# Altium PCB DC-UPS-v1.0.PcbDoc (part 3 of 8)
Units mil, origin at the board's own origin, x right, y up, seen from the top; angles counter-clockwise.
Board outline 5905.51 x 3937.01 mil, 4 copper layers (Top Layer, SIG+PWR, SIG+GND, Bottom Layer), stack 62.449 mil thick; 278 components, 138 nets, 716 pads, 780 vias.
Unrouted connection lines stored in the file: 13.
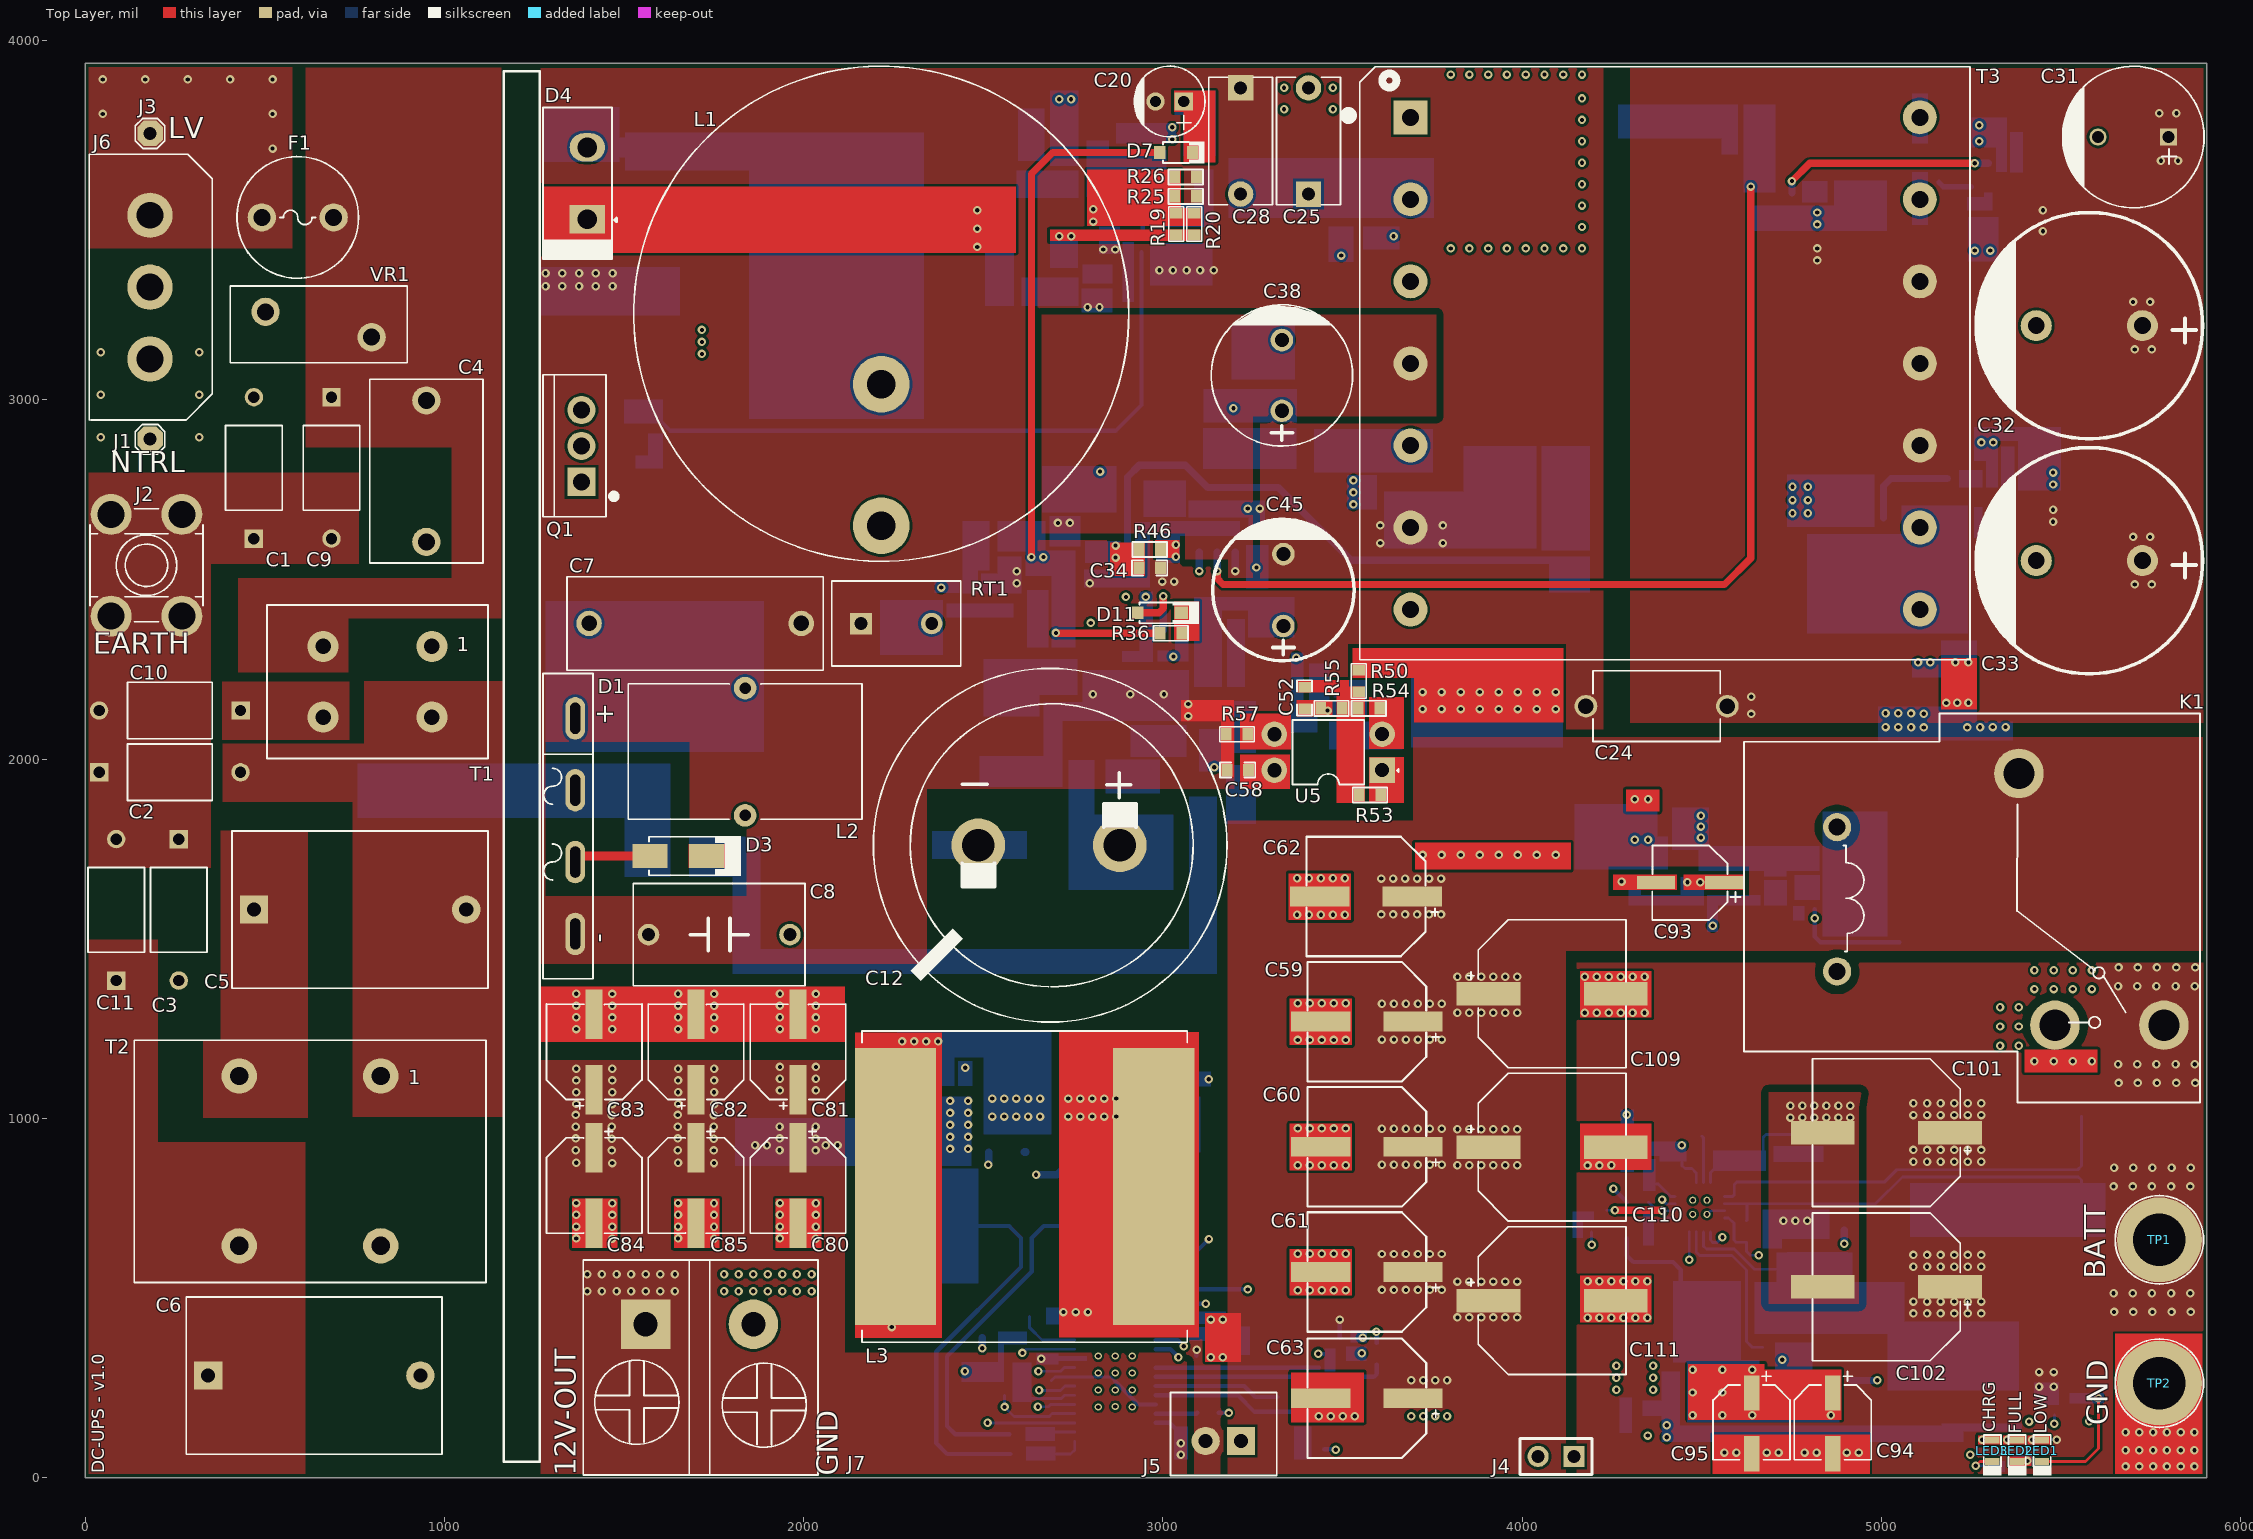
[diagram p0: Top Layer view]

## Part data (continued)
C80 C81 C82 C83 C84 C85: library part 16SVPG270M, "CAP ALUM POLY 270UF 20% 16V SMD", Case/Package=Radial, Dielectric Material=Aluminium, ESR (Equivalent Series Resistance)=8mR, LCSC Part Number=C178351, Leakage Current=864uA, Manufacturer=Panasonic, Max Operating Temperature=105°C, Min Operating Temperature=-55°C, Package Quantity=500, Tolerance=20%, Voltage=24V, Voltage Rating=16V, ComponentLink1Description=http://www.farnell.com/datasheets/2579260.pdf?src-supplier=Farnell, ComponentLink1URL=http://www.farnell.com/datasheets/2579260.pdf?src-supplier=Farnell, ComponentLink2Description=http://industrial.panasonic.com/www-data/pdf/AAB8000/AAB8000CE14.pdf?src-supplier=Avnet, ComponentLink2URL=http://industrial.panasonic.com/www-data/pdf/AAB8000/AAB8000CE14.pdf?src-supplier=Avnet, ComponentLink3Description=http://industrial.panasonic.com/cdbs/www-data/pdf/AAB8000/AAB8000C175.pdf?src-supplier=Farnell, ComponentLink3URL=http://industrial.panasonic.com/cdbs/www-data/pdf/AAB8000/AAB8000C175.pdf?src-supplier=Farnell, ComponentLink4Description=http://www.farnell.com/datasheets/1950075.pdf?src-supplier=Element14, ComponentLink4URL=http://www.farnell.com/datasheets/1950075.pdf?src-supplier=Element14, ComponentLink5Description=https://datasheet.octopart.com/16SVPG270M-Panasonic-datasheet-138704366.pdf?src-supplier=TME, ComponentLink5URL=https://datasheet.octopart.com/16SVPG270M-Panasonic-datasheet-138704366.pdf?src-supplier=TME, ComponentLink6Description=https://datasheet.octopart.com/16SVPG270M-Panasonic-datasheet-151609408.pdf?src-supplier=Master+Electronics, ComponentLink6URL=https://datasheet.octopart.com/16SVPG270M-Panasonic-datasheet-151609408.pdf?src-supplier=Master+Electronics, Diameter=6.3mm, Dissipation Factor=12%, Height=6.6mm, Item Type=Capacitors, Lead Free="Lead Free", Lead Pitch=2.1mm, Length=9.9mm, Life (Hours)=5000Hour, Manufacturer Part Number=16SVPG270M, Material=4242ConductorMaterial, Mounting Technology="Surface Mount", Packaging="Tape and Reel", Pins=10, Pricing="500=0.5687, 1000=0.54, 2500=0.5149, 5000=0.5016, 10000=0.4827 (USD)", Reach SVHC Compliant=No, RoHS=Yes, RoHS Compliant=Yes, Series=SVPG, Stock=18500, Supplier="Arrow Electronics", Termination=SMD/SMT, Voltage Rating (DC)=16V, Width=6.6mm
C87: library part CC0603JRNPO9BN331, "CAP CER 330PF 50V C0G/NPO 0603", Capacitor Type=Ceramic, Case/Package=0603, LCSC Part Number=C62784, Manufacturer=Yageo, Max Operating Temperature=125°C, Min Operating Temperature=-55°C, Package Shape=Rectangular, Package Style=SMTMeter, Rated DC Voltage (URdc)=50V, Supplier Part Number 1=8843708, Temperature Characteristics Code=C0G, Tolerance  (fill in as +-)=5%, Category="Ceramic Capacitors", ComponentLink1Description=https://datasheet.ciiva.com:443/pdfs/VipMasterIC/IC/YAGO/YAGO-S-A0009251638/YAGO-S-A0009251638-1.pdf?src-supplier=IHS+Markit, ComponentLink1URL=https://datasheet.ciiva.com:443/pdfs/VipMasterIC/IC/YAGO/YAGO-S-A0009251638/YAGO-S-A0009251638-1.pdf?src-supplier=IHS+Markit, ComponentLink2Description=https://datasheet.ciiva.com/28450/1443161-28450501.pdf?src-supplier=Element14, ComponentLink2URL=https://datasheet.ciiva.com/28450/1443161-28450501.pdf?src-supplier=Element14, ComponentLink3Description=https://datasheet.ciiva.com/144/mlccorderingcode-144957.pdf?src-supplier=Digi-Key, ComponentLink3URL=https://datasheet.ciiva.com/144/mlccorderingcode-144957.pdf?src-supplier=Digi-Key, ComponentLink4Description=https://datasheet.ciiva.com/144/mlccorderingcode-144956.pdf?src-supplier=Digi-Key, ComponentLink4URL=https://datasheet.ciiva.com/144/mlccorderingcode-144956.pdf?src-supplier=Digi-Key, ComponentLink5Description=https://datasheet.ciiva.com/144/mlccorderingcode-144958.pdf?src-supplier=Digi-Key, ComponentLink5URL=https://datasheet.ciiva.com/144/mlccorderingcode-144958.pdf?src-supplier=Digi-Key, ComponentLink6Description=https://datasheet.ciiva.com/8033/1443161-8033739.pdf?src-supplier=Element14, ComponentLink6URL=https://datasheet.ciiva.com/8033/1443161-8033739.pdf?src-supplier=Element14, ComponentLink7Description=https://datasheet.ciiva.com/8033/1443161-8033737.pdf?src-supplier=Element14, ComponentLink7URL=https://datasheet.ciiva.com/8033/1443161-8033737.pdf?src-supplier=Element14, ComponentLink8Description=https://datasheet.ciiva.com/13389/upy-gp-np0-16v-to-50v-8-13389983.pdf?src-supplier=Mouser, ComponentLink8URL=https://datasheet.ciiva.com/13389/upy-gp-np0-16v-to-50v-8-13389983.pdf?src-supplier=Mouser, ComponentLink9Description=https://datasheet.ciiva.com/11587/upy-gp-np0-16v-to-50v-8-11587326.pdf?src-supplier=Avnet, ComponentLink9URL=https://datasheet.ciiva.com/11587/upy-gp-np0-16v-to-50v-8-11587326.pdf?src-supplier=Avnet, ComponentLink10Description=https://datasheet.ciiva.com/26829/getdatasheetpartid-403533-26829382.pdf?src-supplier=Verical, ComponentLink10URL=https://datasheet.ciiva.com/26829/getdatasheetpartid-403533-26829382.pdf?src-supplier=Verical, Dielectric Material=Ceramic, Height=0.8mm, Item Type=Capacitor, JESD-609 Code=e3, Length=1.6mm, Manufacturer Part Number=CC0603JRNPO9BN331, Mounting Technology="Surface Mount", Multilayer=Yes, Packaging="Tape and Reel", Pins=2, Pricing 1="4000=0.00990, 16000=0.00940, 20000=0.00980, 40000=0.00910, 80000=0.00930, 100000=0.00880, 160000=0.00830, 200000=0.00900, 500000=0.00850 (USD)", Reach SVHC Compliant=Yes, RoHS=Yes, RoHS Compliant=Yes, Stock 1=40000, Supplier 1="Future Electronics", Terminal Finish=Nickel, Termination=Wraparound, Tolerance (fill in as +-)=5%, Width=0.8mm
C93: library part RVT1E330M0505, "33uF 25V 30mA@120Hz ±20% SMD,D5xL5.4mm Aluminum Electrolytic Capacitors - SMD ROHS", LCSC Part Number=C72507, Manufacturer=ROQANG, Package=SMD,D5xL5.4mm, ComponentLink1Description=LCSC, ComponentLink1URL=https://www.lcsc.com/product-detail/Aluminum-Electrolytic-Capacitors-SMD_ROQANG-RVT1E330M0505_C72507.html, Item Type=Capacitor, Manufacturer Part Number=RVT1E330M0505
C94 C95: library part UUD1V150MCL1GS, "CAP ALUM 15UF 20% 35V SMD", Case/Package=Radial, Dielectric Material=Aluminium, LCSC Part Number=C445253, Leakage Current=5.25uA, Manufacturer=Nichicon, Max Operating Temperature=105°C, Min Operating Temperature=-55°C, Package Quantity=1000, Ripple Current=150mA, Tolerance=20%, Voltage Rating=35V, Category="Aluminum Electrolytic Capacitors", ComponentLink1Description=https://datasheet.ciiva.com/96/e-ud-96810.pdf?src-supplier=Digi-Key, ComponentLink1URL=https://datasheet.ciiva.com/96/e-ud-96810.pdf?src-supplier=Digi-Key, ComponentLink2Description=https://datasheet.ciiva.com/96/e-ud-96811.pdf?src-supplier=Digi-Key, ComponentLink2URL=https://datasheet.ciiva.com/96/e-ud-96811.pdf?src-supplier=Digi-Key, ComponentLink3Description=https://datasheet.ciiva.com/96/e-ud-96812.pdf?src-supplier=Digi-Key, ComponentLink3URL=https://datasheet.ciiva.com/96/e-ud-96812.pdf?src-supplier=Digi-Key, Construction=Cylindrical, Diameter=5mm, Height=5.8mm, Impedance=760mR, Item Type=Capacitor, Lead Free="Lead Free", Length=5.8mm, Life (Hours)=2000Hour, Manufacturer Part Number=UUD1V150MCL1GS, Packaging="Tape and Reel", Pins=2, Pricing 1="1=0.1001 (USD)", Radiation Hardening=No, RoHS=Yes, RoHS Compliant=Yes, Series=UD, Stock 1=1, Supplier 1="Arrow Electronics", Supplier Part Number 1=UUD1V150MCL1GS, Termination=SMD/SMT, Voltage Rating (DC)=35V
C97 C99 C100 C107: library part CL10A105KB8NNNC, "CAP CER 1UF 50V X5R 0603", Case Code (Imperial)=0603, Case Code (Metric)=1608, Dielectric=X5R, LCSC Part Number=C15849, Manufacturer=Samsung, Max Operating Temperature=85°C, Min Operating Temperature=-55°C, Tolerance=10%, Voltage Rating=50V, Case/Package=0603, Category="Ceramic Capacitors", ComponentLink1Description=https://datasheet.ciiva.com/26877/getdatasheetpartid-753736-26877879.pdf?src-supplier=Verical, ComponentLink1URL=https://datasheet.ciiva.com/26877/getdatasheetpartid-753736-26877879.pdf?src-supplier=Verical, Depth=0.8mm, Item Type=Capacitor, Length=1.6mm, Manufacturer Part Number=CL10A105KB8NNNC, Material=4241ConductorMaterial, Mounting Technology="Surface Mount", Packaging="Tape and Reel", Pricing="4000=0.01632, 8000=0.01595, 16000=0.01557, 24000=0.0152, 32000=0.01482 (USD)", Radiation Hardening=No, RoHS=Yes, RoHS Compliant=Yes, Series=CL, Stock=780446, Supplier=Avnet, Supplier Part Number=CL10A105KB8NNNC, Voltage Rating (DC)=50V
C101 C102 C109 C110 C111: library part 50SVPF68M, "CAP ALUM POLY 68UF 20% 50V SMD", LCSC Part Number=C178375, Manufacturer=Panasonic, ComponentLink1Description=https://datasheet.ciiva.com/25761/1734360-25761295.pdf?src-supplier=Farnell, ComponentLink1URL=https://datasheet.ciiva.com/25761/1734360-25761295.pdf?src-supplier=Farnell, ComponentLink2Description=https://datasheet.ciiva.com/24071/svpf-os-262415-24071528.pdf?src-supplier=Mouser, ComponentLink2URL=https://datasheet.ciiva.com/24071/svpf-os-262415-24071528.pdf?src-supplier=Mouser, ComponentLink3Description=https://datasheet.ciiva.com/22746/1734360-22746280.pdf?src-supplier=Element14, ComponentLink3URL=https://datasheet.ciiva.com/22746/1734360-22746280.pdf?src-supplier=Element14, Item Type=Capacitors, Manufacturer Part Number=50SVPF68M, Material=4242ConductorMaterial, Pricing="400=1.08, 800=1.05, 1200=1.03, 1600=1.02, 2000=0.985 (USD)", RoHS=Yes, Stock=8800, Supplier="Future Electronics"
C104: library part CC0402JRNPO9BN220, "CAP CER 22PF 50V C0G/NPO 0402", Case Code (Imperial)=0402, Case Code (Metric)=1005, Dielectric=C0G, Dielectric Material=Ceramic, Insulation Resistance=100GR, LCSC Part Number=C106203, Manufacturer=Yageo, Max Operating Temperature=125°C, Min Operating Temperature=-55°C, Package Quantity=1, Supplier Part Number 1=9105957, Temperature Coefficient=30ppm/°C, Tolerance=5%, Voltage=50V, Case/Package=0402, Category="Ceramic Capacitors", ComponentLink1Description=https://datasheet.ciiva.com/5789/1443161-5789509.pdf?src-supplier=Farnell, ComponentLink1URL=https://datasheet.ciiva.com/5789/1443161-5789509.pdf?src-supplier=Farnell, ComponentLink2Description=https://datasheet.ciiva.com/8033/1443161-8033606.pdf?src-supplier=Element14, ComponentLink2URL=https://datasheet.ciiva.com/8033/1443161-8033606.pdf?src-supplier=Element14, ComponentLink3Description=https://datasheet.ciiva.com/7656/1132289-7656615.pdf?src-supplier=Element14, ComponentLink3URL=https://datasheet.ciiva.com/7656/1132289-7656615.pdf?src-supplier=Element14, ComponentLink4Description=https://datasheet.ciiva.com/8033/1443161-8033607.pdf?src-supplier=Element14, ComponentLink4URL=https://datasheet.ciiva.com/8033/1443161-8033607.pdf?src-supplier=Element14, ComponentLink5Description=https://datasheet.ciiva.com/8033/1443161-8033605.pdf?src-supplier=Element14, ComponentLink5URL=https://datasheet.ciiva.com/8033/1443161-8033605.pdf?src-supplier=Element14, ComponentLink6Description=https://datasheet.ciiva.com/143/mlccorderingcode-143987.pdf?src-supplier=Digi-Key, ComponentLink6URL=https://datasheet.ciiva.com/143/mlccorderingcode-143987.pdf?src-supplier=Digi-Key, ComponentLink7Description=https://datasheet.ciiva.com/143/mlccorderingcode-143986.pdf?src-supplier=Digi-Key, ComponentLink7URL=https://datasheet.ciiva.com/143/mlccorderingcode-143986.pdf?src-supplier=Digi-Key, ComponentLink8Description=https://datasheet.ciiva.com/143/mlccorderingcode-143988.pdf?src-supplier=Digi-Key, ComponentLink8URL=https://datasheet.ciiva.com/143/mlccorderingcode-143988.pdf?src-supplier=Digi-Key, ComponentLink9Description=https://datasheet.ciiva.com/5425/upy-gp-np0-16v-to-50v-8-5425483.pdf?src-supplier=Mouser, ComponentLink9URL=https://datasheet.ciiva.com/5425/upy-gp-np0-16v-to-50v-8-5425483.pdf?src-supplier=Mouser, ComponentLink10Description=https://datasheet.ciiva.com/15189/getdatasheetpartid-370074-15189117.pdf?src-supplier=Verical, ComponentLink10URL=https://datasheet.ciiva.com/15189/getdatasheetpartid-370074-15189117.pdf?src-supplier=Verical, Depth=0.5mm, Height=0.5mm, Item Type=Capacitor, Lead Free="Lead Free", Length=1mm, Manufacturer Part Number=CC0402JRNPO9BN220, Mounting Technology="Surface Mount", Packaging="Tape and Reel", Pins=2, Pricing 1="10000=0.00220, 40000=0.00210, 150000=0.00200, 400000=0.00190, 1000000=0.00180 (USD)", Radiation Hardening=No, Reach SVHC Compliant=Yes, Resistor Type=Ceramic, RoHS=Yes, RoHS Compliant=Yes, Series=CC, Stock 1=200000, Supplier 1="Future Electronics", Termination=SMD/SMT, Thickness=0.022inch, Voltage Rating=50V, Voltage Rating (DC)=50V, Width=0.02inch
C108: library part CC0402JRNPO9BN101, "CAP CER 100PF 50V C0G/NPO 0402", Case Code (Imperial)=0402, Case Code (Metric)=1005, Dielectric=C0G, Dielectric Material=Ceramic, Insulation Resistance=100GR, LCSC Part Number=C106200, Manufacturer=Yageo, Max Operating Temperature=125°C, Min Operating Temperature=-55°C, Package Quantity=1, Supplier Part Number=8934564, Temperature Coefficient=30ppm/°C, Tolerance=5%, Voltage=50V, Case/Package=0402, Category="Ceramic Capacitors", ComponentLink1Description=https://datasheet.ciiva.com/11786/0900766b80d84fbf-11786101.pdf?src-supplier=Rs, ComponentLink1URL=https://datasheet.ciiva.com/11786/0900766b80d84fbf-11786101.pdf?src-supplier=Rs, ComponentLink2Description=https://datasheet.ciiva.com/23767/25787-23767888.pdf?src-supplier=Newark, ComponentLink2URL=https://datasheet.ciiva.com/23767/25787-23767888.pdf?src-supplier=Newark, ComponentLink3Description=https://datasheet.ciiva.com/28450/1443161-28450220.pdf?src-supplier=Element14, ComponentLink3URL=https://datasheet.ciiva.com/28450/1443161-28450220.pdf?src-supplier=Element14, ComponentLink4Description=https://datasheet.ciiva.com/8033/1443161-8033598.pdf?src-supplier=Element14, ComponentLink4URL=https://datasheet.ciiva.com/8033/1443161-8033598.pdf?src-supplier=Element14, ComponentLink5Description=https://datasheet.ciiva.com/143/mlccorderingcode-143990.pdf?src-supplier=Digi-Key, ComponentLink5URL=https://datasheet.ciiva.com/143/mlccorderingcode-143990.pdf?src-supplier=Digi-Key, ComponentLink6Description=https://datasheet.ciiva.com/143/mlccorderingcode-143989.pdf?src-supplier=Digi-Key, ComponentLink6URL=https://datasheet.ciiva.com/143/mlccorderingcode-143989.pdf?src-supplier=Digi-Key, ComponentLink7Description=https://datasheet.ciiva.com/143/mlccorderingcode-143991.pdf?src-supplier=Digi-Key, ComponentLink7URL=https://datasheet.ciiva.com/143/mlccorderingcode-143991.pdf?src-supplier=Digi-Key, Depth=0.5mm, Height=0.5mm, Item Type=Capacitor, Lead Free="Lead Free", Length=1mm, Manufacturer Part Number=CC0402JRNPO9BN101, Mounting Technology="Surface Mount", Packaging="Tape and Reel", Pins=2, Pricing="10000=0.002, 40000=0.0019, 150000=0.0018, 400000=0.0018, 1000000=0.0017 (USD)", Radiation Hardening=No, Reach SVHC Compliant=No, RoHS=Yes, RoHS Compliant=Yes, Series=CC, Stock=11720000, Supplier="Future Electronics", Termination=SMD/SMT, Thickness=0.022inch, Voltage Rating=50V, Voltage Rating (DC)=50V, Width=0.02inch
D1: "BRIDGE RECT 1PHASE 600V 8A GBU", LCSC Part Number=C150753, Manufacturer=Diodes, ComponentLink1Description=https://datasheet.ciiva.com/27052/1540404-27052400.pdf?src-supplier=Jameco, ComponentLink1URL=https://datasheet.ciiva.com/27052/1540404-27052400.pdf?src-supplier=Jameco, ComponentLink2Description=https://datasheet.ciiva.com/16206/ds21227-16206956.pdf?src-supplier=Future+Electronics, ComponentLink2URL=https://datasheet.ciiva.com/16206/ds21227-16206956.pdf?src-supplier=Future+Electronics, ComponentLink3Description=https://datasheet.ciiva.com/15145/getdatasheetpartid-157294-15145339.pdf?src-supplier=Verical, ComponentLink3URL=https://datasheet.ciiva.com/15145/getdatasheetpartid-157294-15145339.pdf?src-supplier=Verical, ComponentLink4Description=https://datasheet.ciiva.com/885/ds21227-885908.pdf?src-supplier=Digikey, ComponentLink4URL=https://datasheet.ciiva.com/885/ds21227-885908.pdf?src-supplier=Digikey, ComponentLink5Description=https://datasheet.ciiva.com/11195/ds21227-11195657.pdf?src-supplier=Avnet, ComponentLink5URL=https://datasheet.ciiva.com/11195/ds21227-11195657.pdf?src-supplier=Avnet, Item Type=Diode, Manufacturer Part Number=GBU806, Pricing="20=0.565, 100=0.54, 500=0.51, 1000=0.5, 3000=0.465 (USD)", RoHS=Yes, Stock=174414, Supplier="Future Electronics"
D2 D3: "DIODE GEN PURP 600V 1A SMA", Average Rectified Current=2A, Case/Package=SMA, Forward Voltage=1.25V, LCSC Part Number=C50432, Manufacturer="ON Semiconductor", Max Forward Surge Current (Ifsm)=30A, Max Operating Temperature=175°C, Max Repetitive Reverse Voltage (Vrrm)=600V, Max Reverse Current=5uA, Min Operating Temperature=-65°C, Output Current=1A, Package Quantity=1, ComponentLink1Description=https://datasheet.ciiva.com/8293/mura160t3-d-8293035.pdf?src-supplier=Avnet, ComponentLink1URL=https://datasheet.ciiva.com/8293/mura160t3-d-8293035.pdf?src-supplier=Avnet, ComponentLink2Description=https://datasheet.ciiva.com/27056/2015775-27056224.pdf?src-supplier=Jameco, ComponentLink2URL=https://datasheet.ciiva.com/27056/2015775-27056224.pdf?src-supplier=Jameco, ComponentLink3Description=https://datasheet.ciiva.com/16395/mura160t3-d-16395990.pdf?src-supplier=Future+Electronics, ComponentLink3URL=https://datasheet.ciiva.com/16395/mura160t3-d-16395990.pdf?src-supplier=Future+Electronics, Current Rating=2A, Forward Current=2A, Halogen Free="Halogen Free", Height=2mm, Item Type=Diode, Lead Free="Lead Free", Length=4.32mm, Manufacturer Part Number=MURA160T3G, Max Reverse Voltage (DC)=600V, Max Surge Current=30A, Packaging="Tape and Reel", Peak Non-Repetitive Surge Current=30A, Pins=2, Polarity=Standard, Pricing="5000=0.109, 10000=0.106, 15000=0.104, 20000=0.103, 25000=0.0996 (USD)", Radiation Hardening=No, Reach SVHC Compliant=No, Recovery Time=75ns, Reverse Recovery Time=75ns, Reverse Recovery Time-Max=75ns, Reverse Voltage=600V, RoHS=Yes, RoHS Compliant=Yes, Series=-, Stock=190000, Supplier="Future Electronics", Voltage Rating (DC)=600V, Width=2.6mm
D4: "DIODE GEN PURP 600V 8A TO220FPAC", LCSC Part Number=C77956, Manufacturer=STMicroelectronics, ComponentLink1Description=https://datasheet.ciiva.com/4455/cd00002721-110256-4455363.pdf?src-supplier=Mouser, ComponentLink1URL=https://datasheet.ciiva.com/4455/cd00002721-110256-4455363.pdf?src-supplier=Mouser, ComponentLink2Description=https://datasheet.ciiva.com/7964/1522573-7964086.pdf?src-supplier=Element14, ComponentLink2URL=https://datasheet.ciiva.com/7964/1522573-7964086.pdf?src-supplier=Element14, ComponentLink3Description=https://datasheet.ciiva.com/917/cd00002721-917751.pdf?src-supplier=Digikey, ComponentLink3URL=https://datasheet.ciiva.com/917/cd00002721-917751.pdf?src-supplier=Digikey, ComponentLink4Description=https://datasheet.ciiva.com/14169/cd00002721-14169005.pdf?src-supplier=Distrelec, ComponentLink4URL=https://datasheet.ciiva.com/14169/cd00002721-14169005.pdf?src-supplier=Distrelec, Item Type=Diode, Manufacturer Part Number=STTH8L06FP, Pricing="1=0.8, 10=0.793, 50=0.793, 100=0.793, 1000=0.673, 10000=0.377 (USD)", RoHS=Yes, Stock=2675, Supplier=Mouser